# Altium PCB Docking-Station-PCB.PcbDoc
Units mil, origin at the board's own origin, x right, y up, seen from the top; angles counter-clockwise.
Board outline 665.35 x 684.89 mil, 2 copper layers (Top Layer, Bottom Layer), stack 61.811 mil thick; 1 components, 1 nets, 3 pads, 0 vias.
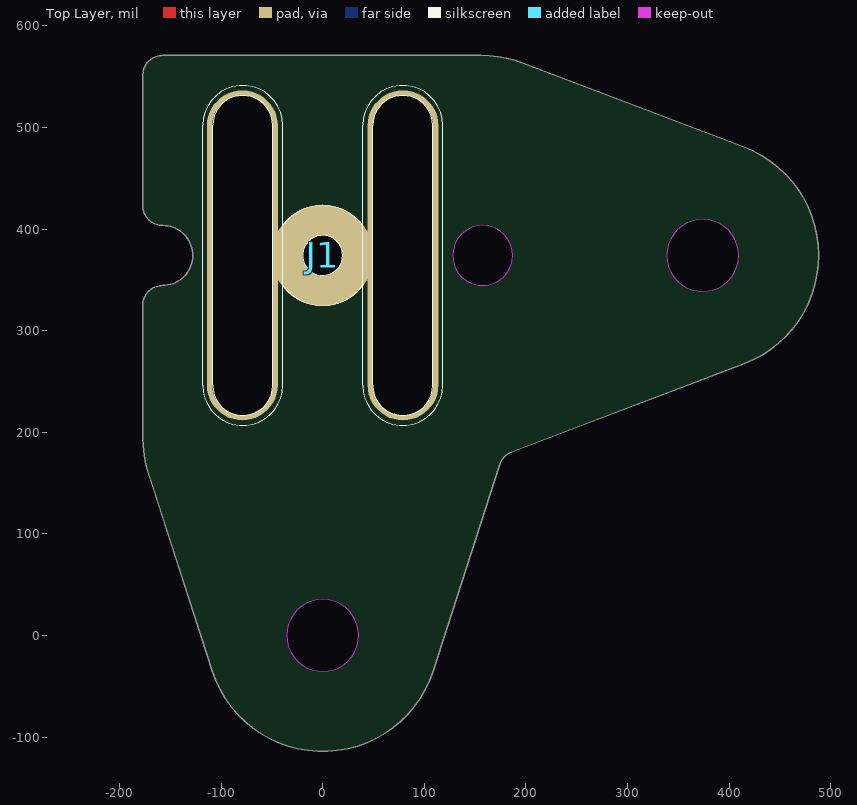
[diagram p0: Top Layer view]
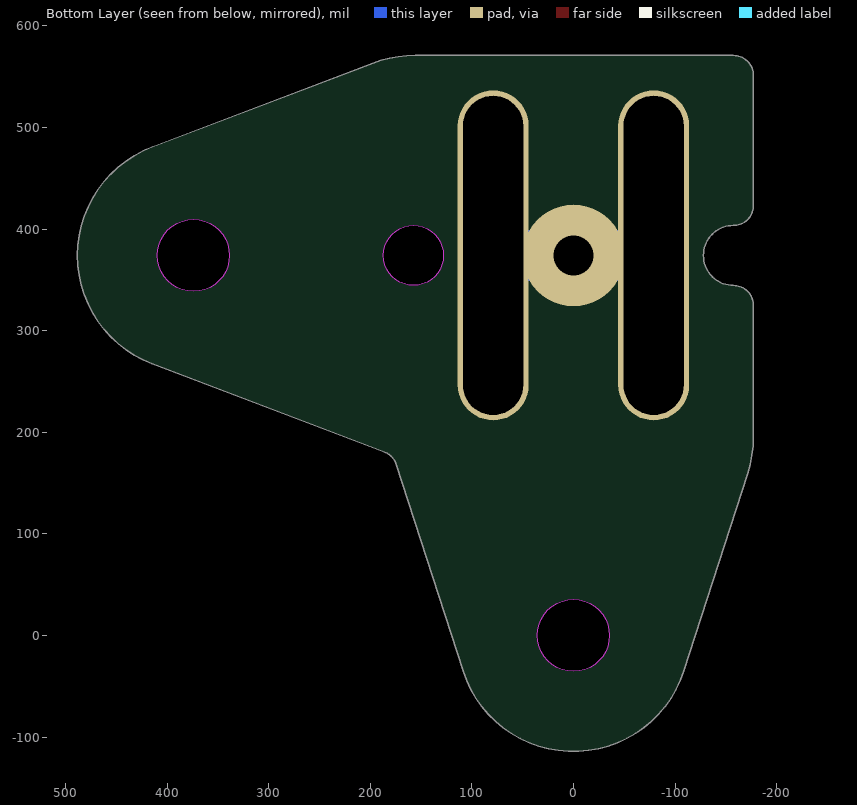
[diagram p1: Bottom Layer view, seen from below]

## Layer stack, top to bottom
Top Solder: solder mask 0.3937, Solder Resist, Dk 3.5
Top Layer: signal copper 1.378
Dielectric 1: dielectric 59.0551, FR-4, Dk 4.8
Bottom Layer: signal copper 1.378
Bottom Solder: solder mask 0.3937, Solder Resist, Dk 3.5

## Board outline
-171.45,159.47 cw(c-59.06,195.76) -177.17,195.76 -177.17,324.8 cw(c-157.48,324.8) -157.48,344.49 ccw(c-157.48,374.02) -157.48,403.54 cw(c-157.48,423.23) -177.17,423.23 -177.17,551.18 cw(c-157.48,551.18) -157.48,570.87 155.5,570.87 cw(c155.5,452.76) 197.42,563.18 414.54,480.76 cw(c374.02,374.02) 414.54,267.27 186.01,180.52 ccw(c192.99,162.12) 174.26,168.17 108.65,-35.07 cw(c0,0) -108.65,-35.07
cut-out: 338.58,374.02 ccw(c374.02,374.02) 374.02,338.58 ccw(c374.02,374.02) 409.45,374.02 ccw(c374.02,374.02) 374.02,409.45 ccw(c374.02,374.02)
cut-out: 127.95,374.02 ccw(c157.48,374.02) 157.48,344.49 ccw(c157.48,374.02) 187.01,374.02 ccw(c157.48,374.02) 157.48,403.54 ccw(c157.48,374.02)
cut-out: -35.43,0 ccw(c0,0) 0,-35.43 ccw(c0,0) 35.43,0 ccw(c0,0) 0,35.43 ccw(c0,0)

## Design rules (kind name [scope] priority, off if disabled: settings)
BoardOutlineClearance [All] p1: gap=0 ignorepadtopadclearanceinfootprint=FALSE except(10: Poly-OutlineEdge)
Clearance [All] p1: gap=10 ignorepadtopadclearanceinfootprint=FALSE except(0: Arc-Hole Track-Hole SMDPad-Hole THPad-Hole Via-Hole Fill-Hole Poly-Hole Region-Hole Text-Hole)
HoleSize [All] p1: absolutevalues=TRUE maxlimit=1000 minlimit=1 maxpercent=80.000 minpercent=20.000
HoleToHoleClearance [All] p1: gap=0 allowstackedmicrovias=TRUE
MinimumSolderMaskSliver [All] p1: minsoldermaskwidth=0
PolygonConnect [All] p1: connectstyle=Relief reliefconductorwidth=10 reliefentries=4 polygonreliefangle="90 Angle" airgapwidth=10
RoutingVias [All] p1: holewidth=28 width=50 viastyle="Through Hole" minholewidth=28 minwidth=50 maxholewidth=28 maxwidth=50
SilkToSilkClearance [All] p1: silktosilkclearance=0
SilkToSolderMaskClearance [IsPad] p1: minsilkscreentomaskgap=0 clearancetoexposedcopper=TRUE
SolderMaskExpansion [All] p1: expansion=4 istentingtop=FALSE
Width [All] p1: maxlimit=100 minlimit=10 preferedwidth=10
25 further rules are at their usual default settings.

## Components (designator, comment, footprint, x,y, rotation, side; value= is the part's Value field where it differs from the comment)
J1 "Shrapnel Contact Battery Connectors" "Shrapnel Contact Battery Connectors" 79,374.02 r180 top

## Footprints (in the part's own frame and the unit in brackets; to place one, negate y for a bottom-side part, rotate by r counter-clockwise, add the part's x,y. Pads: shape width x height; smd on the part's side, far side on the other; paste and mask are expansions set on the pad)
"Shrapnel Contact Battery Connectors" [mil]
  oval 69.9x324.8 hole 59 slot 314 at 90 deg: 1(0,0) 2(158,0)
  round 100 hole 39.37: MH(79,0)
  silkscreen extent -39,-167 197,167

## Part data
J1: "2P Shrapnel Contact Battery Connectors"

## Nets (pads, with @x,y where several pads share a name; then routed paths per layer and width w, separated by ;. In a path a pad name is that pad's centre, name@x,y a point inside that pad or via, vN(x,y) a via of type N, cw(c..) or ccw(c..) an arc to the next point about the centre after c; other vN are vias at no path point)
VCC: J1.1 J1.2 J1.MH | length 316
  Top Layer w50: J1.2 J1.MH J1.1
  Bottom Layer w50: J1.2 J1.MH J1.1

## Silkscreen, mask and mechanical layers (free items; w line width, h text height)
Board_Outline:
  circle w7: c374.02,374.02 r35.43
  circle w7: c157.48,374.02 r29.53
  circle w7: c0,0 r35.43
  lines w7: -177.17,195.76 ccw(c-59.06,195.76) -171.45,159.47 -108.65,-35.07 ccw(c0,0) 108.65,-35.07 174.26,168.17 cw(c192.99,162.12) 186.01,180.52 414.54,267.27 ccw(c374.02,374.02) 414.54,480.76 197.42,563.18 ccw(c155.5,452.76) 155.5,570.87 -157.48,570.87 ccw(c-157.48,551.18) -177.17,551.18 -177.17,423.23 ccw(c-157.48,423.23) -157.48,403.54 cw(c-157.48,374.02) -157.48,344.49 ccw(c-157.48,324.8) -177.17,324.8 -177.17,195.76
Fabrication_Layer:
  drawing of 191 lines, arcs and shapes, not listed
  text "Layer" at 615.34,759 h60
  text "Name" at 1025.26,759 h60
  text "Material" at 1955,759 h60
  text "Thickness" at 2814.77,759 h60
  text "Constant" at 3464.6,759 h60
  text "Board Layer Stack" at 4034.46,759 h60
  text "Top Overlay" at 1025.26,639 h60
  text "Top Solder" at 1025.26,519 h60
  text "Solder Resist" at 1955,519 h60
  text "0.39mil" at 2814.77,519 h60
  text "3.5" at 3464.6,519 h60
  text "1" at 615.34,399 h60
  text "Top Layer" at 1025.26,399 h60
  text "1.38mil" at 2814.77,399 h60
  text "Dielectric 1" at 1025.26,279 h60
  text "FR-4" at 1955,279 h60
  text "59.06mil" at 2814.77,279 h60
  text "4.8" at 3464.6,279 h60
  text "2" at 615.34,159 h60
  text "Bottom Layer" at 1025.26,159 h60
  text "1.38mil" at 2814.77,159 h60
  text "Bottom Solder" at 1025.26,39 h60
  text "Solder Resist" at 1955,39 h60
  text "0.39mil" at 2814.77,39 h60
  text "3.5" at 3464.6,39 h60
  text "Bottom Overlay" at 1025.26,-81 h60
  text "Total board thickness:" at 615.34,-201 h60
  text "62.60mil" at 2814.77,-201 h60
Drill Drawing:
  circle w10: c654.62,1379.27 r33.33
  lines w10: 621.29,1495.94 687.96,1495.94 687.96,1562.61 621.29,1562.61 621.29,1495.94
  lines w15: 561.5,1300.94 14089.68,1300.94 ; 561.5,1600.94 14089.68,1600.94 ; 1112.38,1150.94 1112.38,1750.94 ; 1592.26,1150.94 1592.26,1750.94 ; 2681.94,1150.94 2681.94,1750.94 ; 3187.81,1150.94 3187.81,1750.94 ; 3921.62,1150.94 3921.62,1750.94 ; 5421.17,1150.94 5421.17,1750.94 ; 6011.02,1150.94 6011.02,1750.94 ; 6756.81,1150.94 6756.81,1750.94 ; 8016.44,1150.94 8016.44,1750.94 ; 8870.21,1150.94 8870.21,1750.94 ; 10203.81,1150.94 10203.81,1750.94 ; 11537.42,1150.94 11537.42,1750.94 ; 12687.08,1150.94 12687.08,1750.94 ; 561.5,1150.94 14089.68,1150.94 14089.68,1750.94 561.5,1750.94 561.5,1150.94
  text "Symbol" at 651.5,1645.94 h72
  text "Count" at 1157.38,1645.94 h72
  text "Hole Size" at 1637.26,1645.94 h72
  text "Plated" at 2726.94,1645.94 h72
  text "Hole Type" at 3232.81,1645.94 h72
  text "Drill Layer Pair" at 3966.62,1645.94 h72
  text "Via/Pad" at 5466.17,1645.94 h72
  text "Pad Shape" at 6056.02,1645.94 h72
  text "Template" at 6801.81,1645.94 h72
  text "Description" at 8061.44,1645.94 h72
  text "Hole Tolerance (+)" at 8915.21,1645.94 h72
  text "Hole Tolerance (-)" at 10248.81,1645.94 h72
  text "Hole Length" at 11582.42,1645.94 h72
  text "Routed Path Length" at 12732.08,1645.94 h72
  text "1" at 1157.38,1495.94 h60
  text "39.37mil (1.000mm)" at 1637.26,1495.94 h60
  text "PTH" at 2726.94,1495.94 h60
  text "Round" at 3232.81,1495.94 h60
  text "Top Layer - Bottom Layer" at 3966.62,1495.94 h60
  text "Pad" at 5466.17,1495.94 h60
  text "Rounded" at 6056.02,1495.94 h60
  text "c254h100" at 6801.81,1495.94 h60
  text "-" at 11582.42,1495.94 h60
  text "-" at 12732.08,1495.94 h60
  text "2" at 1157.38,1345.94 h60
  text "59.00mil (1.499mm)" at 1637.26,1345.94 h60
  text "PTH" at 2726.94,1345.94 h60
  text "Slot" at 3232.81,1345.94 h60
  text "Top Layer - Bottom Layer" at 3966.62,1345.94 h60
  text "Pad" at 5466.17,1345.94 h60
  text "Rounded" at 6056.02,1345.94 h60
  text "r825_178h150_798r100" at 6801.81,1345.94 h60
  text "314.00mil (7.976mm)" at 11582.42,1345.94 h60
  text "255.00mil (6.477mm)" at 12732.08,1345.94 h60
  text "3 Total" at 1157.38,1195.94 h60
  text "Slot definitions :" at 651.5,1050.97 h60
  text "Routed Path Length" at 1684.19,1050.97 h60
  text "= Calculated from tool start centre position to tool end centre position." at 2786.86,1050.97 h60
  text "Hole Length" at 1684.19,950.99 h60
  text "= Routed Path Length + Tool Size = Slot length as defined in the PCB layout" at 2376.99,950.99 h60

## Dimensions
-157.48,570.87 to 0,-114.17 on Dimension
-177.17,551.18 to 488.19,374.02 on Dimension